# Altium PCB LUICD_LIGHT_PCB_Central.PcbDoc
Units mm, origin at the board's own origin, x right, y up, seen from the top; angles counter-clockwise.
Board outline 69.09 x 64.39 mm, 4 copper layers (Top Layer, GND, +48V, Bottom Layer), stack 1.58 mm thick; 5 components, 3 nets, 15 pads, 0 vias.
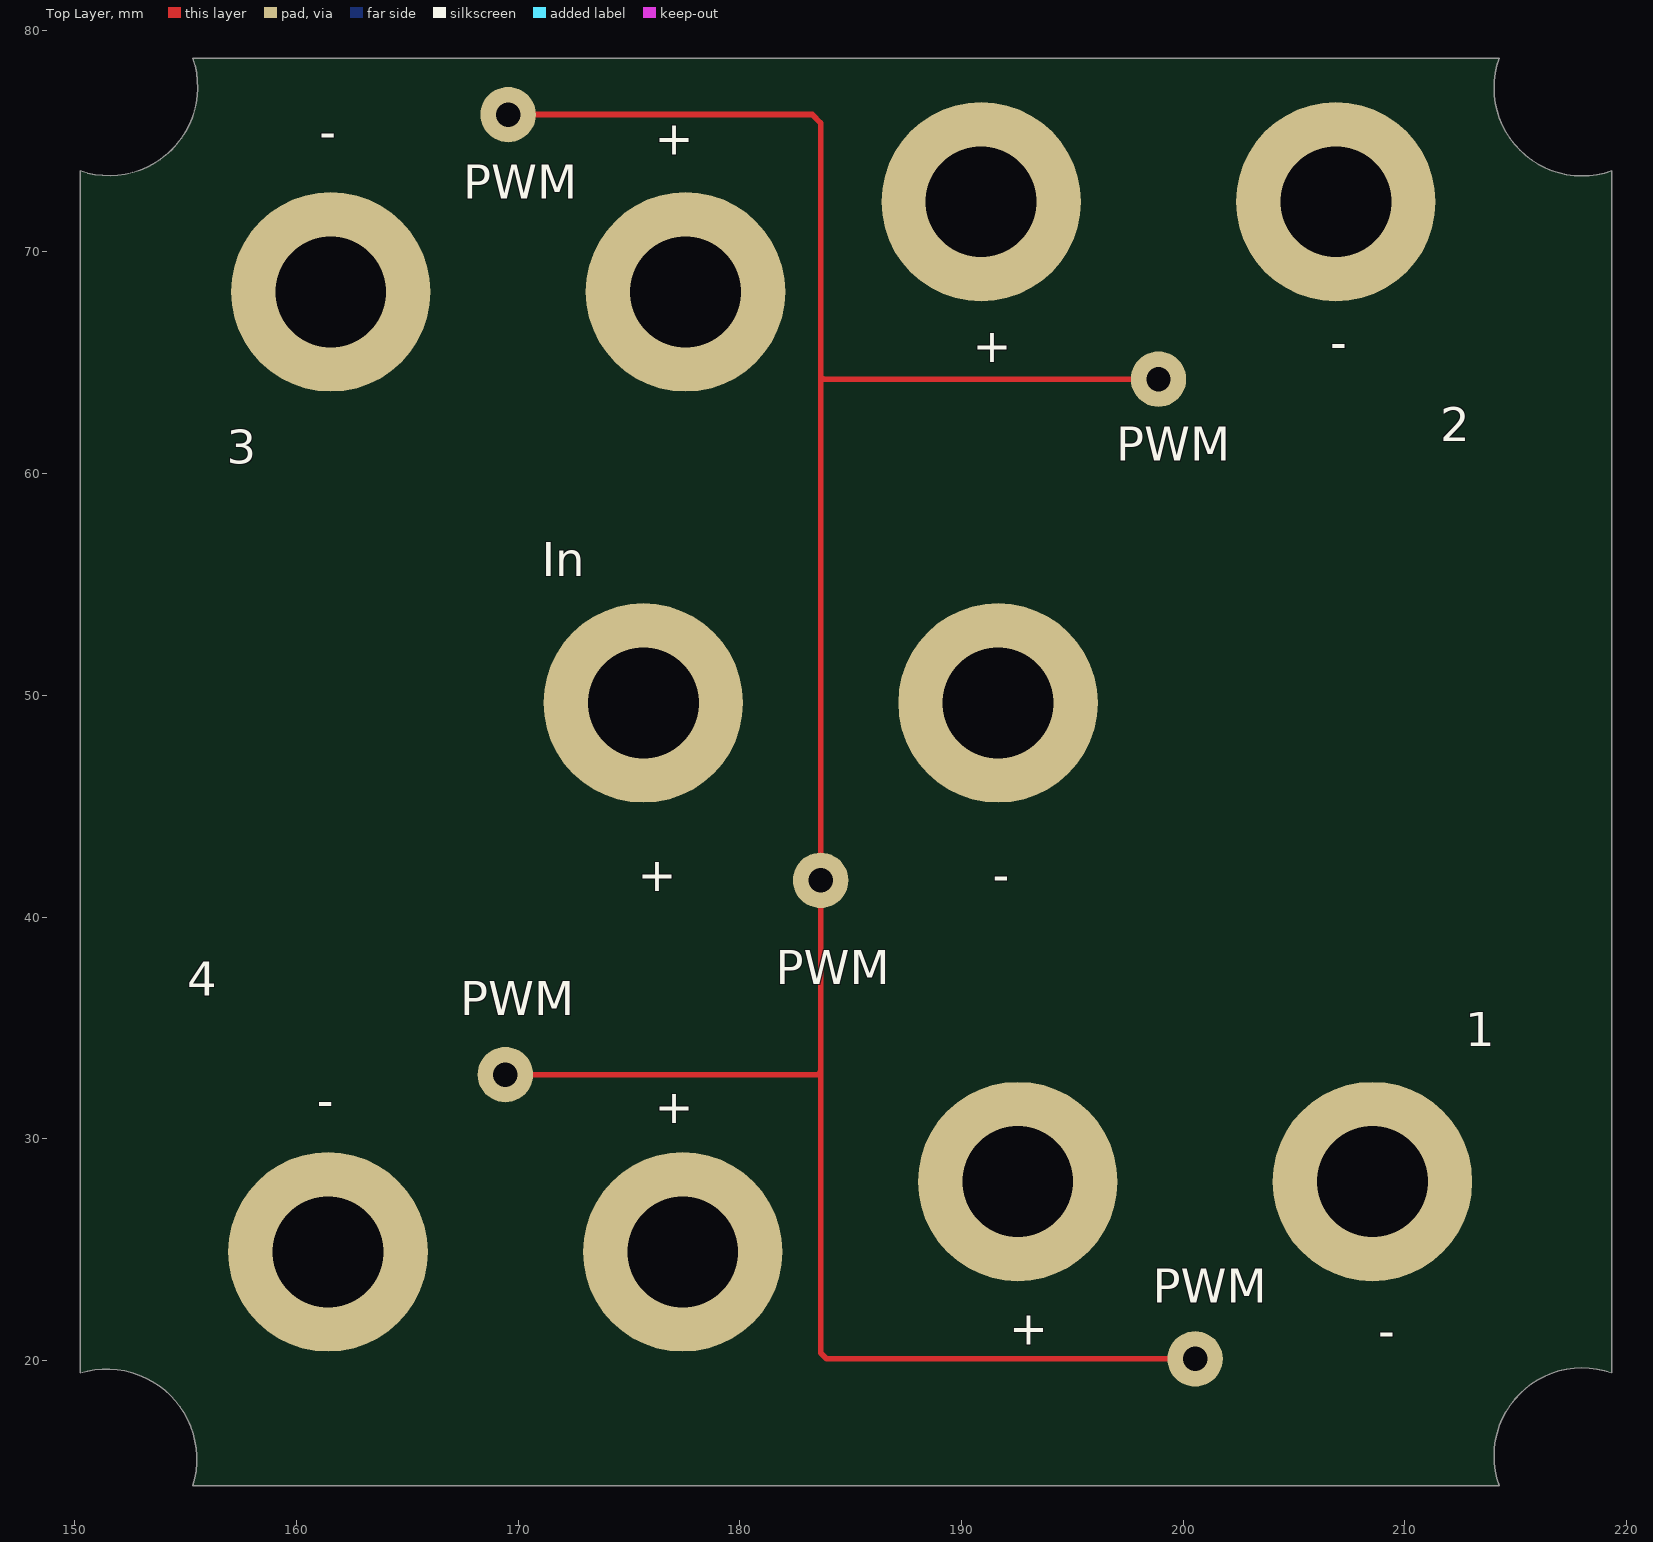
[diagram p0: Top Layer view]
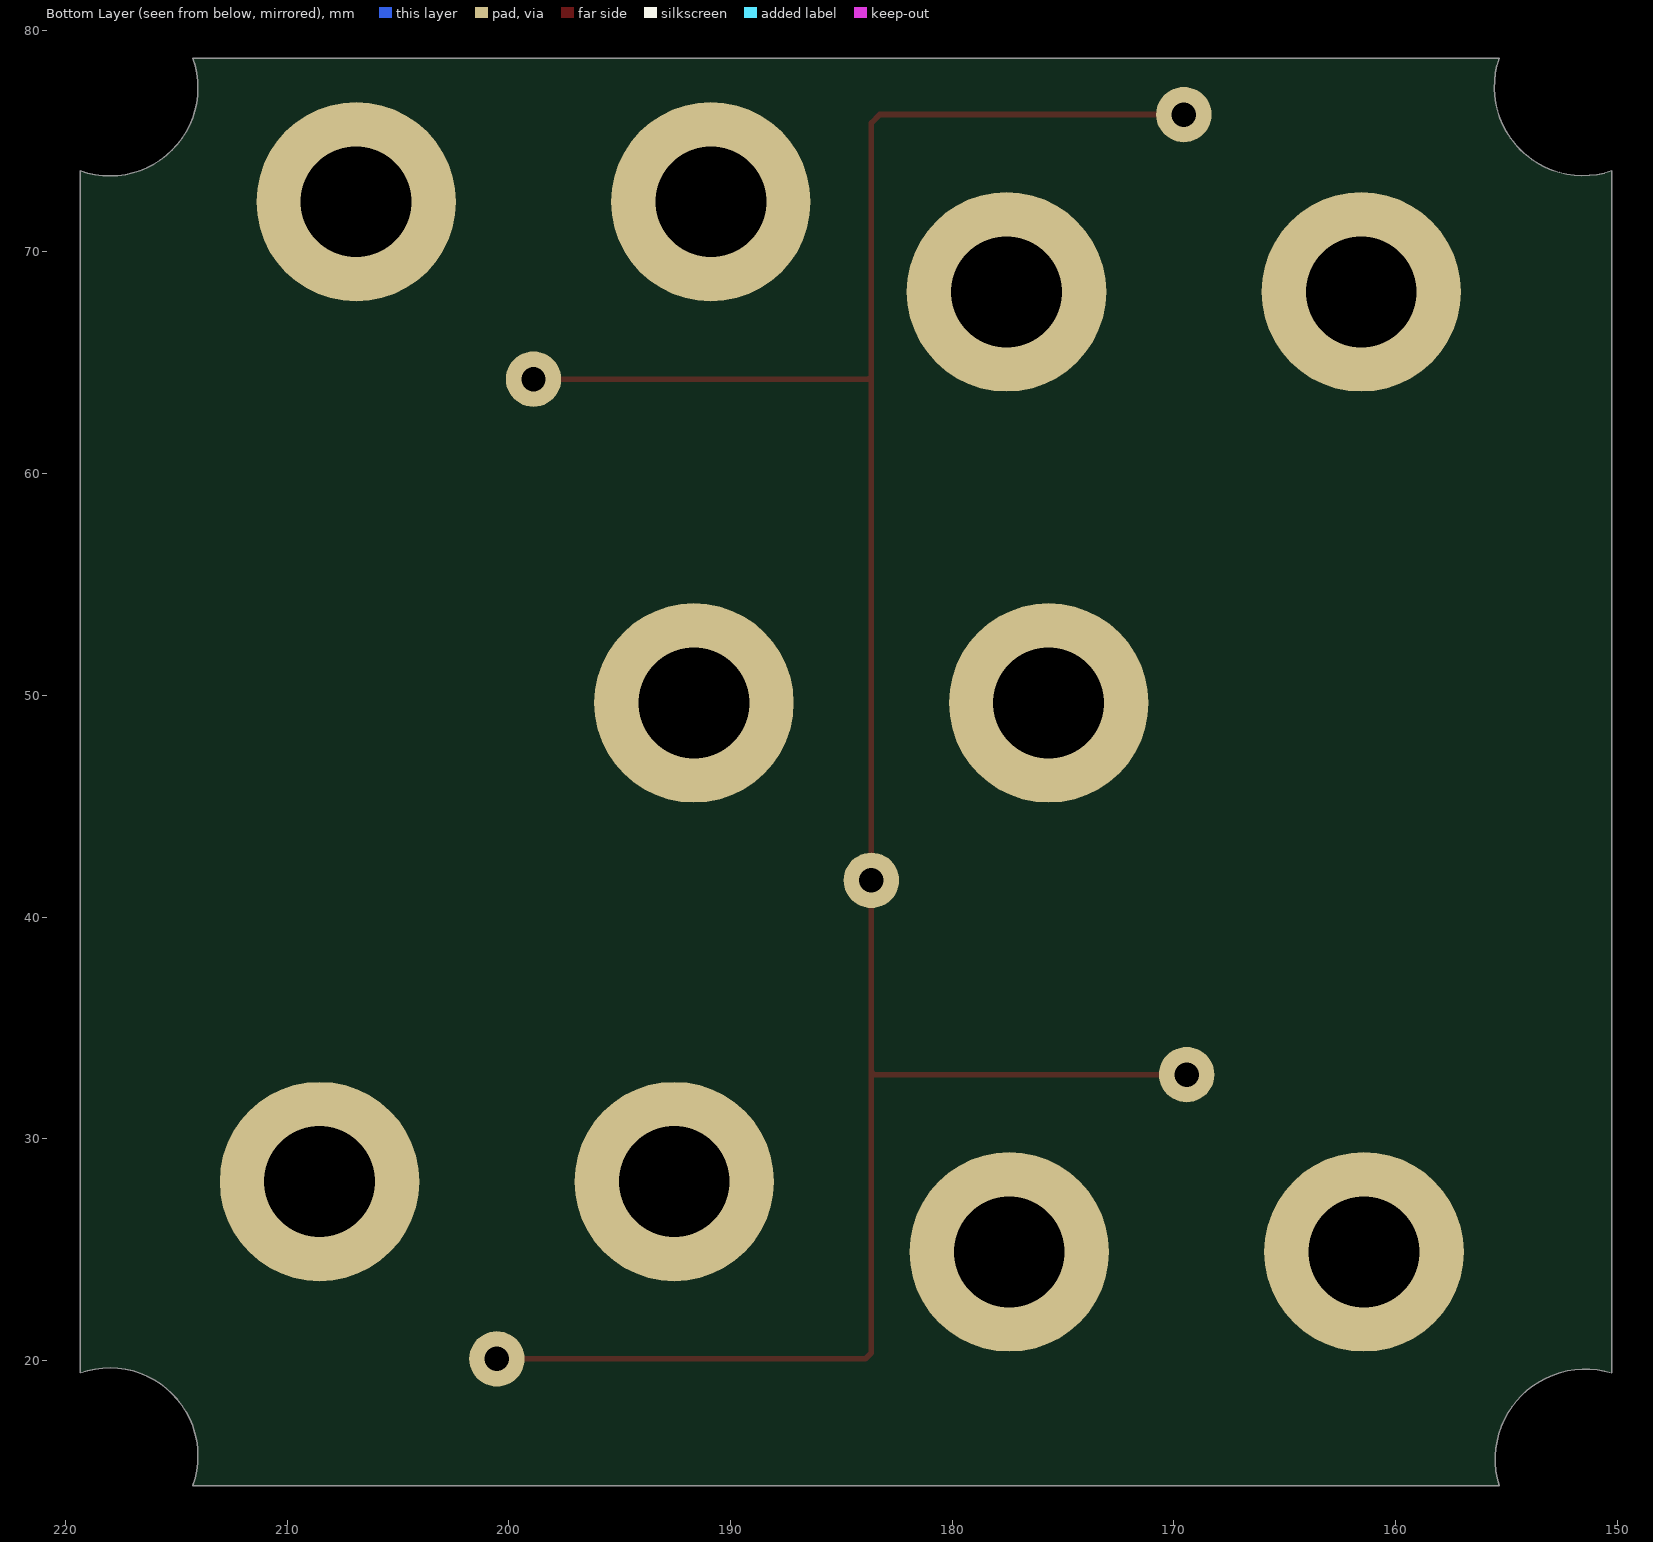
[diagram p1: Bottom Layer view, seen from below]
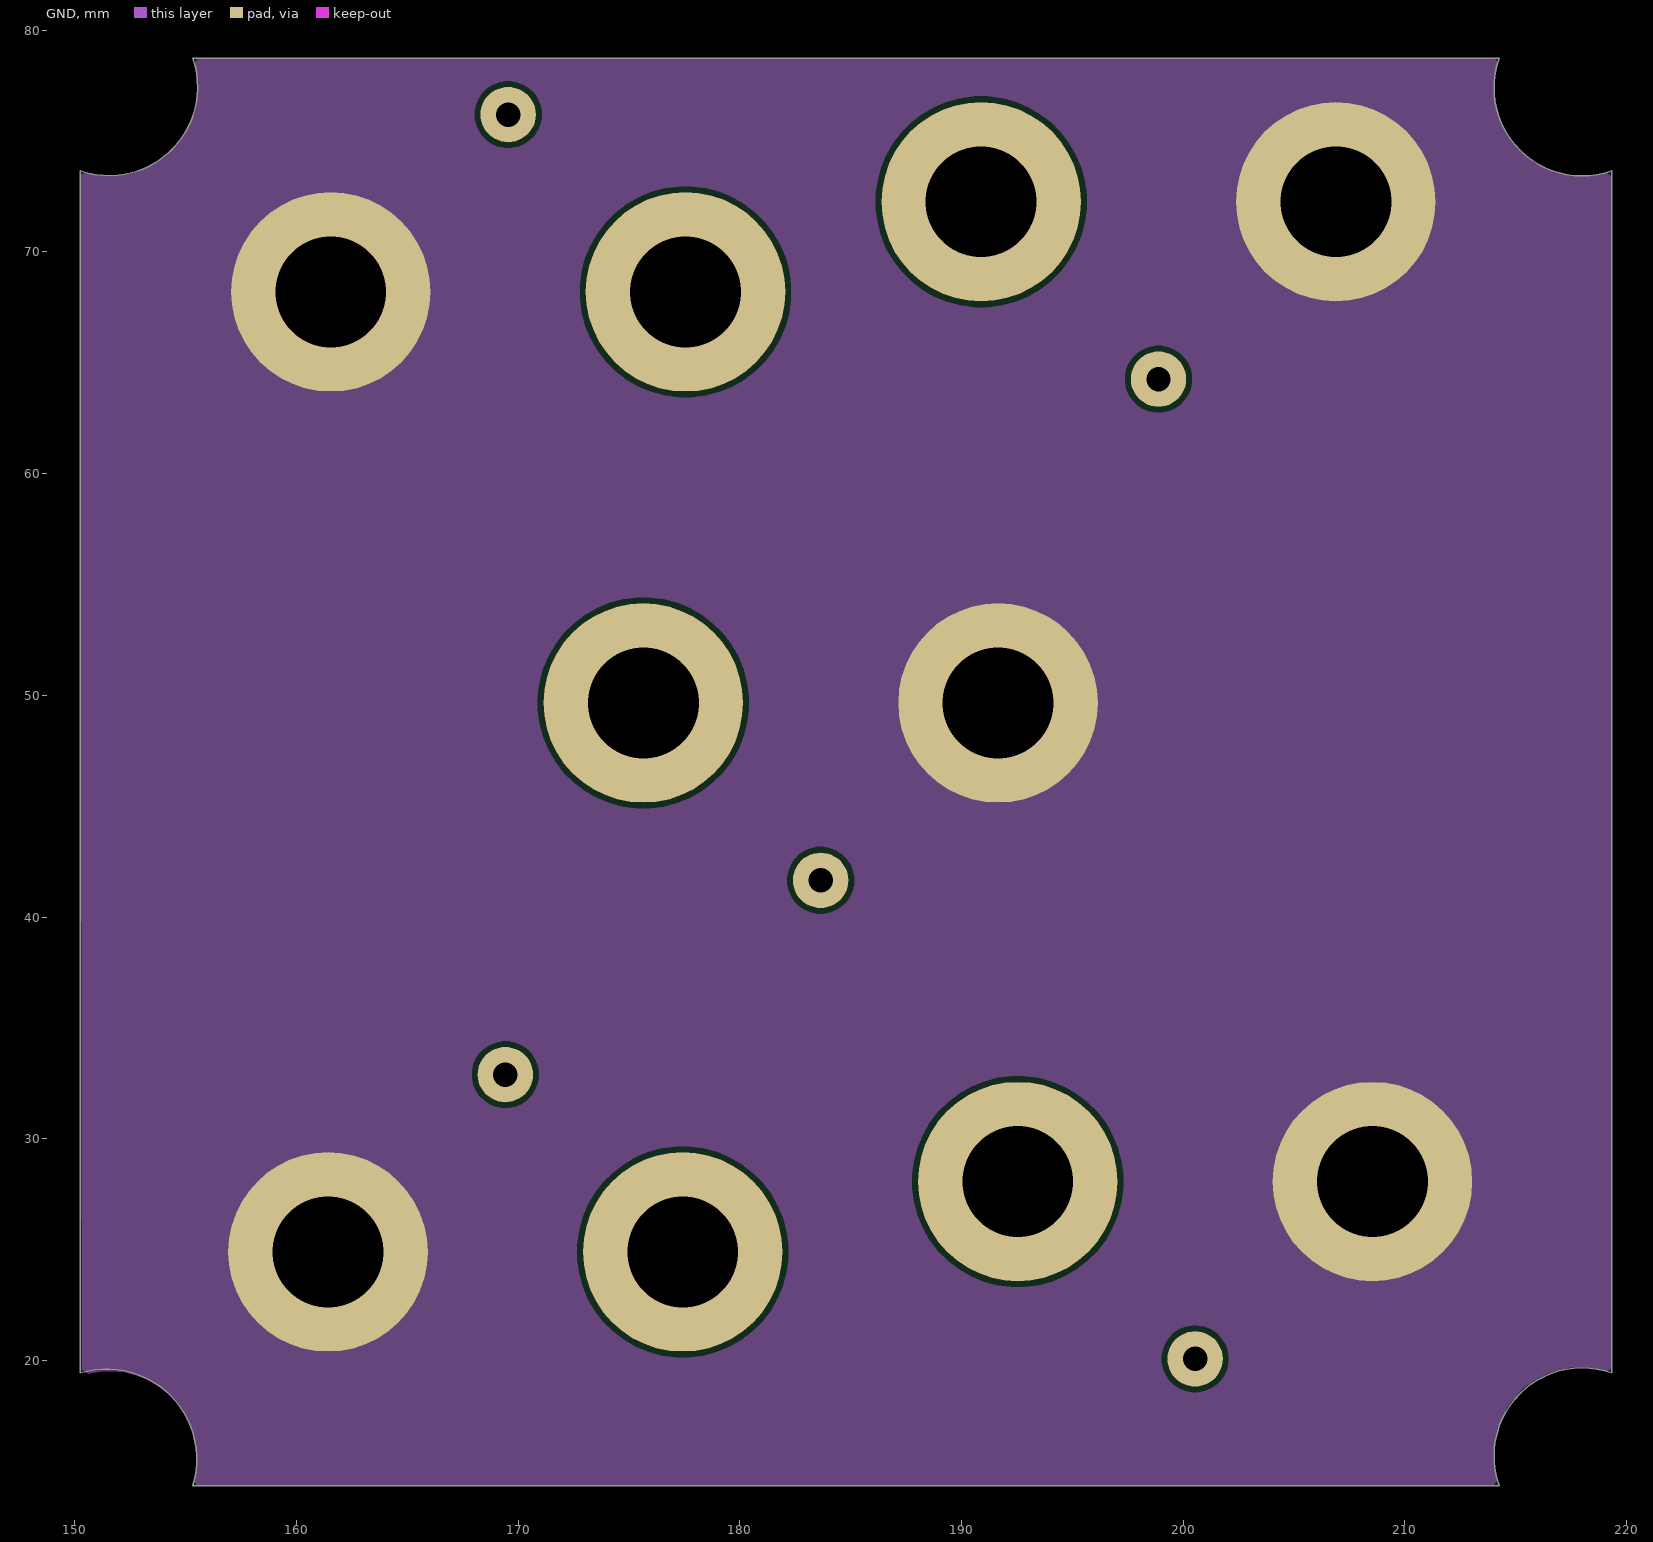
[diagram p2: GND]
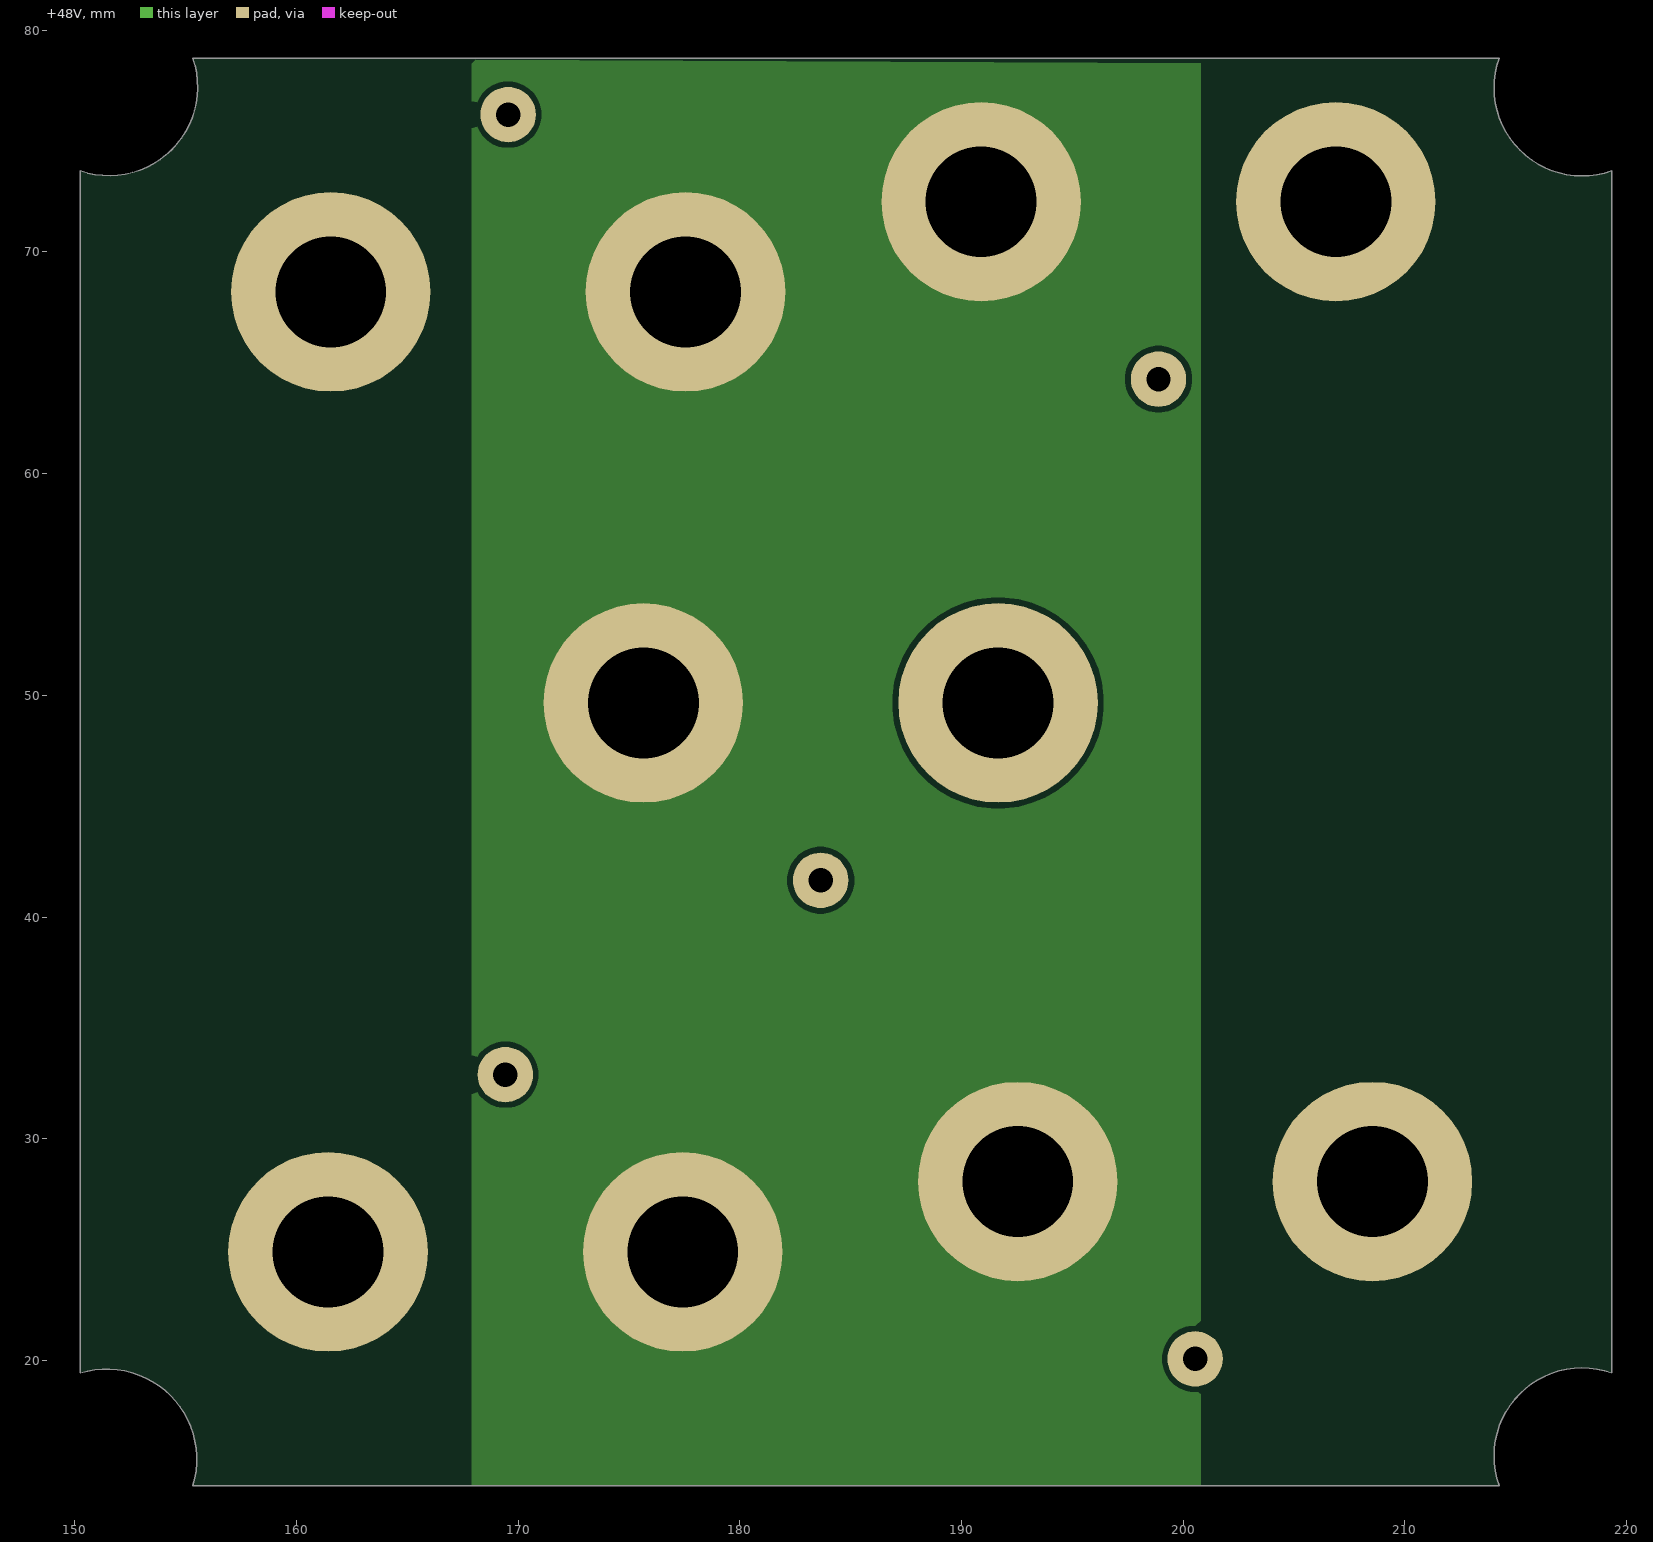
[diagram p3: +48V]

## Layer stack, top to bottom
Top Solder: solder mask 0.01, Solder Resist, Dk 3.5
Top Layer: signal copper 0.07
Dielectric 2: prepreg 0.2, PP-006, Dk 4.1
GND: signal copper 0.07
Dielectric 1: dielectric 0.9, FR-4, Dk 4.8
+48V: signal copper 0.07
Dielectric 3: prepreg 0.2, PP-006, Dk 4.1
Bottom Layer: signal copper 0.07
Bottom Solder: solder mask 0.01, Solder Resist, Dk 3.5

## Board outline
150.241,19.431 150.241,73.66 ccw(c151.544,77.437) 155.321,78.74 214.249,78.74 ccw(c217.995,77.406) 219.329,73.66 219.329,19.431 ccw(c217.995,15.685) 214.249,14.351 155.321,14.351 ccw(c151.432,15.542)

## Design rules (kind name [scope] priority, off if disabled: settings)
Clearance [All] p1: gap=0.254 ignorepadtopadclearanceinfootprint=FALSE
HoleSize [All] p1: absolutevalues=TRUE maxlimit=5.1 minlimit=0.025 maxpercent=80.000 minpercent=20.000
PolygonConnect [All] p1: connectstyle=Direct reliefconductorwidth=0.254 reliefentries=4 polygonreliefangle="90 Angle" airgapwidth=0.254
RoutingVias [All] p1: holewidth=0.711 width=1.27 viastyle="Through Hole" minholewidth=0.711 minwidth=1.27 maxholewidth=0.711 maxwidth=1.27
SolderMaskExpansion [All] p1: expansion=0 istentingtop=FALSE
Width [All] p1: maxlimit=0.254 minlimit=0.254 preferedwidth=0.254
29 further rules are at their usual default settings.

## Components (designator, comment, footprint, x,y, rotation, side; value= is the part's Value field where it differs from the comment)
1 "WIRE_OUTPUT" PCBComponent_1 200.533,28.067 r0 top
2 "WIRE_OUTPUT" PCBComponent_1 198.882,72.263 r0 top
3 "WIRE_OUTPUT" PCBComponent_1 169.545,68.199 r180 top
4 "WIRE_OUTPUT" PCBComponent_1 169.418,24.892 r180 top
In "WIRE_INPUT" PCBComponent_1 183.643,49.657 r0 top

## Footprints (in the part's own frame and the unit in brackets; to place one, negate y for a bottom-side part, rotate by r counter-clockwise, add the part's x,y. Pads: shape width x height; smd on the part's side, far side on the other; paste and mask are expansions set on the pad)
PCBComponent_1 [mm]
  round 9 hole 5: 1(-8,0) 2(8,0)
  round 2.5 hole 1.1: 3(0,-8)

## Part data
In: library part WIRE_OUTPUT

## Nets (pads, with @x,y where several pads share a name; then routed paths per layer and width w, separated by ;. In a path a pad name is that pad's centre, name@x,y a point inside that pad or via, vN(x,y) a via of type N, cw(c..) or ccw(c..) an arc to the next point about the centre after c; other vN are vias at no path point)
+48V: 1.1 2.1 3.1 4.1 In.1
GND: 1.2 2.2 3.2 4.2 In.2
PWM: 1.3 2.3 3.3 4.3 In.3 | length 116.3
  Top Layer w0.254: 4.3 183.515,32.892 183.643,33.02 ; 3.3 183.262,76.199 183.643,75.818 183.643,64.389 ; 2.3 183.769,64.263 183.643,64.389 ; 1.3 183.918,20.067 183.643,20.342 183.643,33.02 ; 183.643,33.02 In.3 183.643,64.389

## Polygon pours and split planes (outlines as drawn)
+48V on +48V "+48V_L03_P000" (solid, remove dead copper, pour order 0): 167.894,78.662 167.894,14.351 200.787,14.351 200.787,78.516
GND on GND "GND_L02_P001" (solid, remove dead copper, pour order 1): 155.312,78.74 214.249,78.74 ccw(c218.016,77.427) 219.329,73.66 219.329,19.431 ccw(c217.917,15.763) 214.249,14.351 155.321,14.351 ccw(c151.57,15.572) 150.342,19.321 150.25,73.669 ccw(c151.557,77.426)

## Text inside footprints (layer, text, board x,y; h text height)
1: Top Overlay "PWM" at 198.628,22.606 h1.52; Top Overlay "-" at 208.788,20.574 h1.52; Top Overlay "+" at 192.151,20.701 h1.52
2: Top Overlay "+" at 190.5,65.024 h1.52; Top Overlay "-" at 206.629,65.151 h1.52; Top Overlay "PWM" at 196.977,60.579 h1.52
3: Top Overlay "+" at 177.927,75.692 h1.52 r180; Top Overlay "-" at 161.798,75.819 h1.52 r180; Top Overlay "PWM" at 167.513,72.39 h1.52
4: Top Overlay "+" at 177.927,32.004 h1.52 r180; Top Overlay "-" at 161.671,32.131 h1.52 r180; Top Overlay "PWM" at 167.386,35.56 h1.52
In: Top Overlay "PWM" at 181.61,36.957 h1.52; Top Overlay "-" at 191.397,41.149 h1.52; Top Overlay "+" at 175.397,41.157 h1.52